# Altium PCB adau1979-fpga.PcbDoc (part 5 of 10)
Units mil, origin at the board's own origin, x right, y up, seen from the top; angles counter-clockwise.
Board outline 7874.02 x 9055.12 mil, 4 copper layers (Top Layer, GND, POWER, Bottom Layer), stack 23.756 mil thick; 636 components, 457 nets, 2015 pads, 4184 vias.
Unrouted connection lines stored in the file: 10.
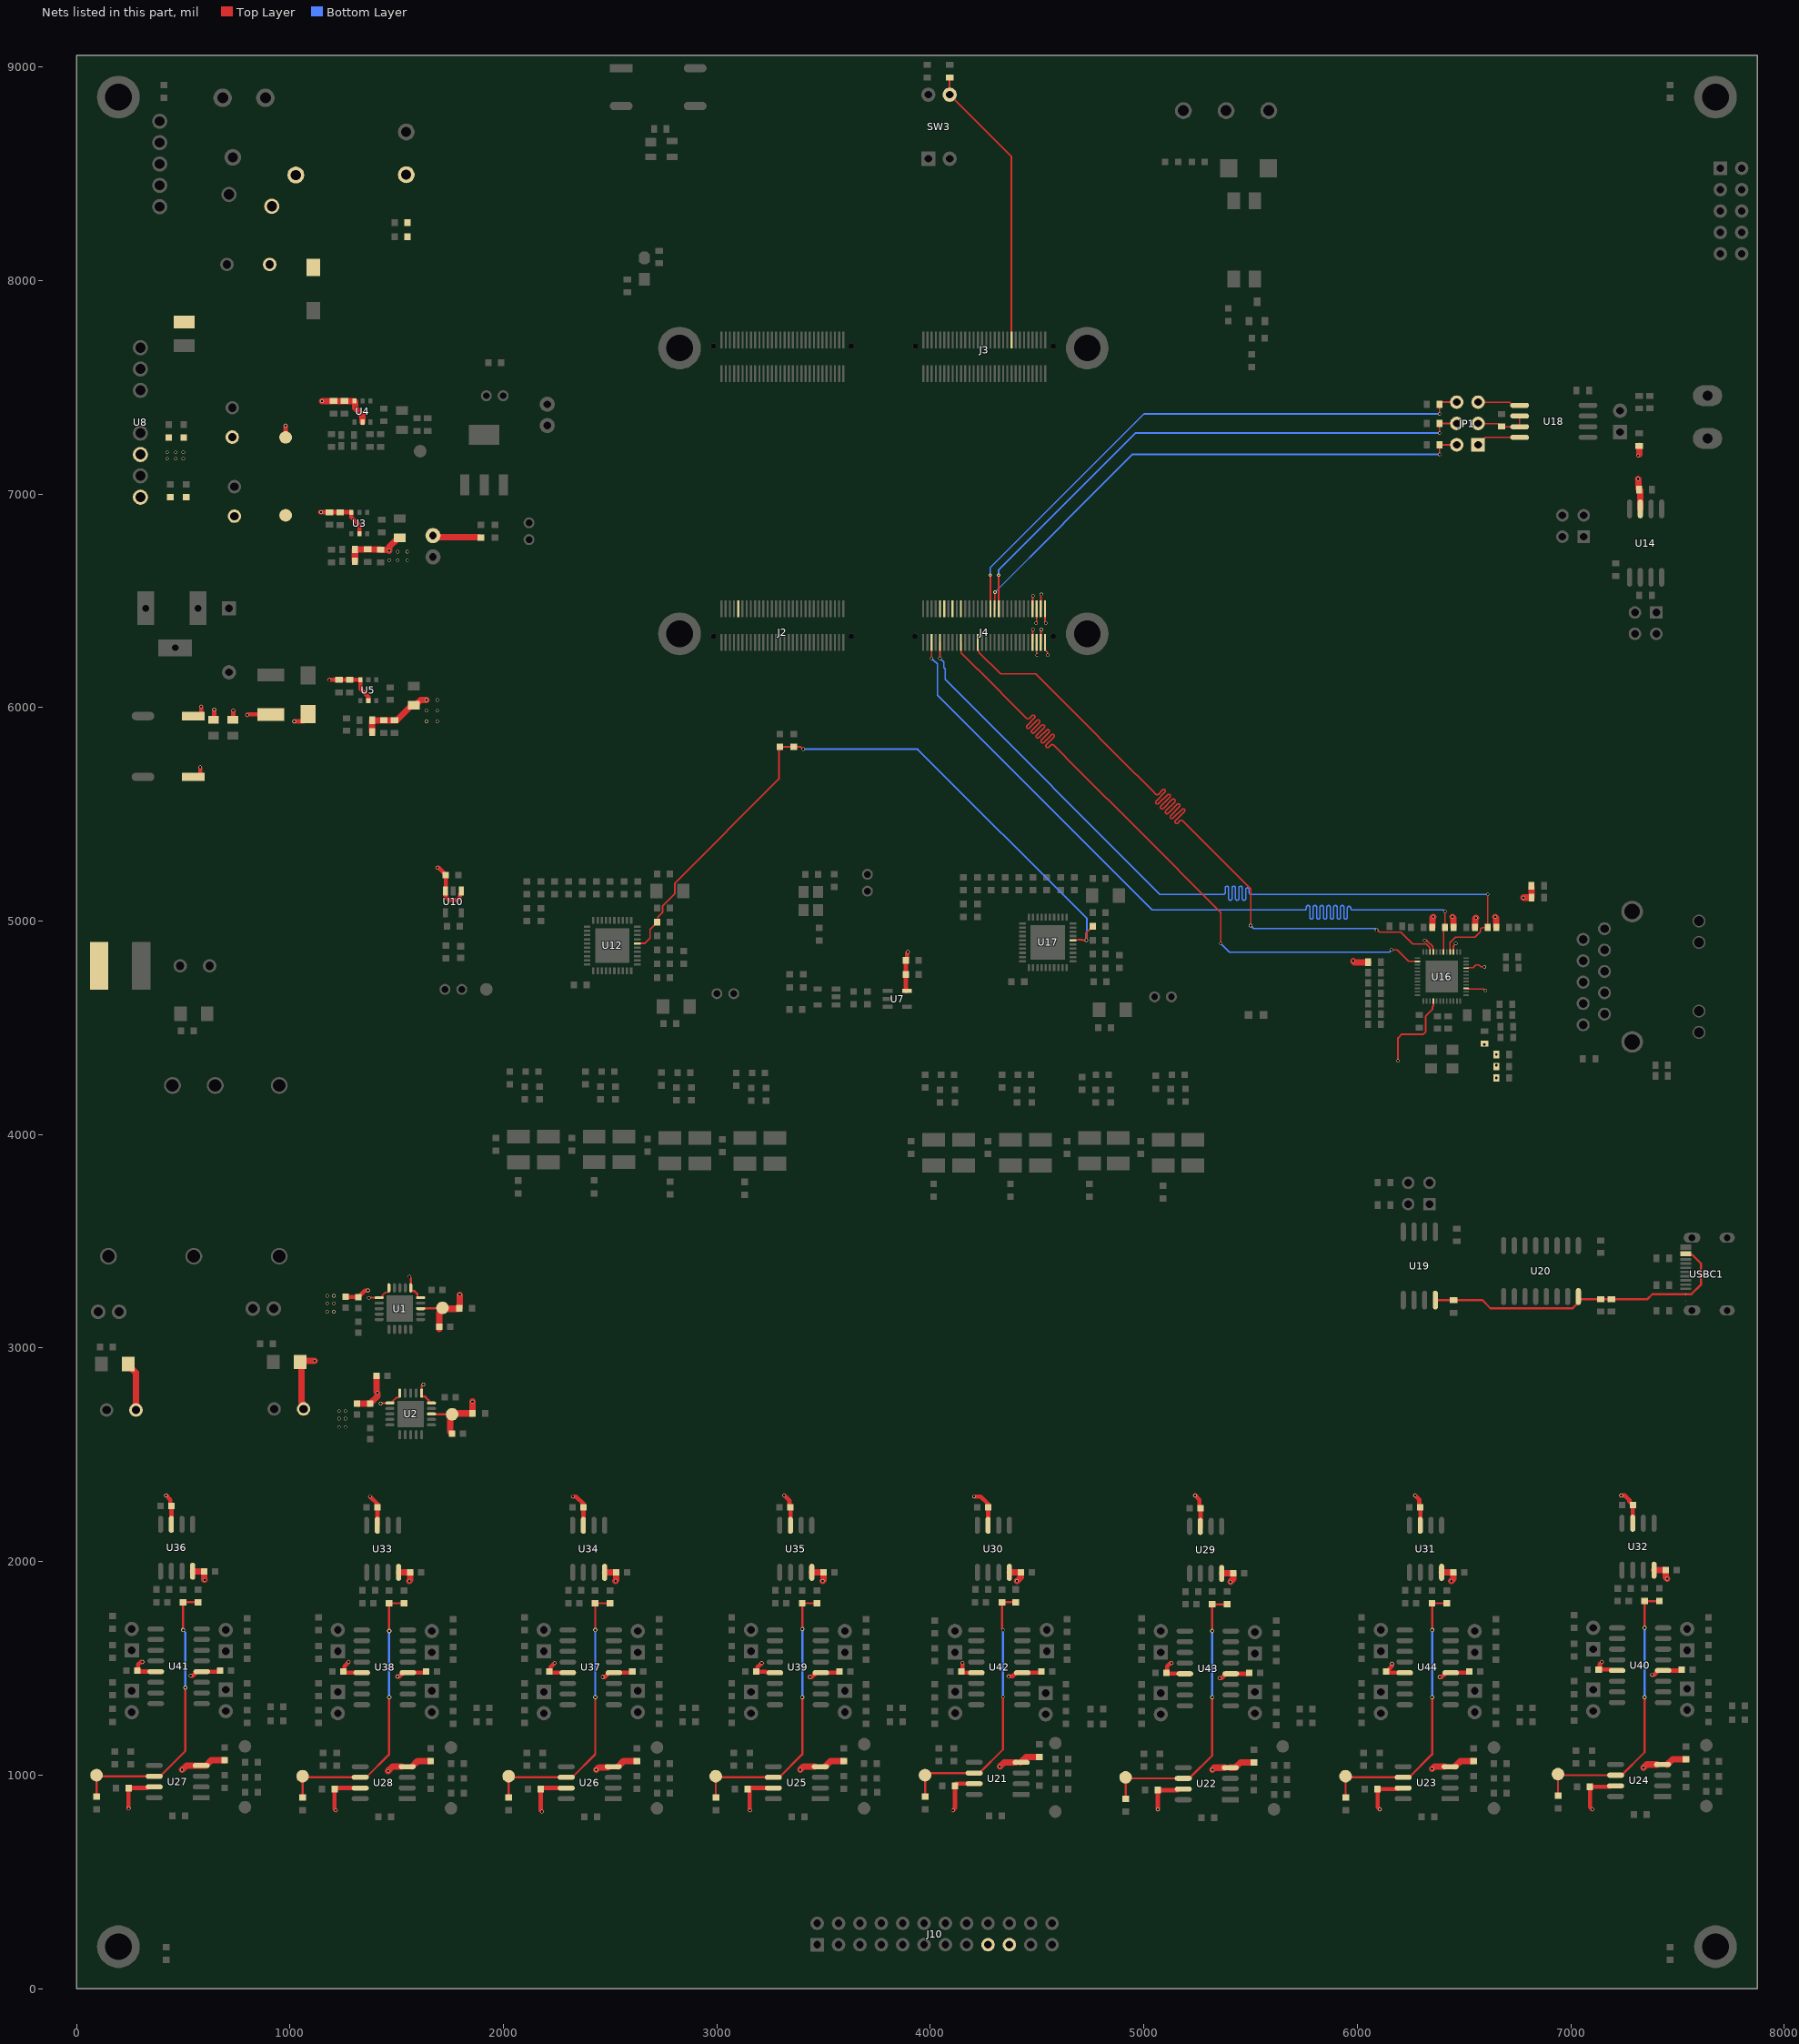
[diagram p4: the nets of this part, all layers, seen from the top]

## Part data (continued)
U9: "输入类型:DC;正向压降(Vf):1.2V;输出电流:50mA;隔离电压(Vrms):5kV;直流反向耐压(Vr):6V;负载电压:80V;输出通道数:-;集射极饱和电压(VCE(sat)):200mV@20mA,1mA;", Current Transfer Ratio (CTR) Maximum/Saturation Value=600%, Current Transfer Ratio (CTR) Minimum=50%, Forward Current(If)=50mA, Isolation Voltage(Vrms)=5kV, JLCPCB Part Class="Extended Part", LCSC Part Name="DC输入 隔离电压(rms):5000V", Load Voltage=80V, Manufacturer=SHARP(夏普), ManufacturerPart=PC817X2CSP9F, Operating Temperature=-30℃~+100℃, Reverse Voltage=6V, Total Power Dissipation(Pd)=200mW, Voltage - Forward(Vf)=1.2V, AddInBom=yes, ConvertToPcb=yes, Datasheet=https://item.szlcsc.com/datasheet/PC817X2CSP9F/67489.html, Fall time=3us, FootprintName=SMD-4_L4.6-W6.5-P2.54-LS10.2-TL, Input type=DC, ModelId=991879f0d3e24dbd9895164815fb95aa, ModelName=SMD-4_L4.6-W6.5-H3.7-LS10.2-P2.54, ModelTransform=401.94494,181.102,0,0,0,0,0,0.003,0, Number of Outputs=-, Output Current=50mA, Output Type=光电三极管, Rise time=4us, Supplier=LCSC, Supplier Footprint=SMD-4P, SupplierPart=C66405, Symbol=PC817X2CSP9F, Vce Saturation(VCE(sat))=200mV@20mA,1mA
U10: "输出极性:正极;工作电压:5.5V;输出电压:3.3V;输出电流:250mA;电源纹波抑制比(PSRR):82dB@(1kHz);输出类型:固定;", JLCPCB Part Class="Extended Part", LCSC Part Name="3.3V 250mA 5.5V", Manufacturer=TI(德州仪器), ManufacturerPart=LP5907MFX-3.3/NOPB, Operating Temperature=-40℃~+125℃@(Tj), Output Current=250mA, Output Voltage=3.3V, Power Supply Rejection Ratio (PSRR)=82dB@(1kHz), standby current=12uA, Voltage - Supply=5.5V, Voltage Dropout=250mV@(250mA), AddInBom=yes, ConvertToPcb=yes, Datasheet=https://www.ti.com/cn/lit/ds/symlink/lp5907.pdf, Features=热关断；使能控制；输出放电；短路保护；输入欠压保护, FootprintName=SOT-23-5_L3.0-W1.7-P0.95-LS2.8-BR, ModelId=0a2a1b8f50944f73965918ad6e5fe167, ModelName=SOT-23-5_L2.9-W1.6-H1.1-LS2.8-P0.95, ModelTransform=114.173,109.636,0,180,0,0,0,0,0, Noise=10uVrms, Number of Outputs=1, Output Configuration=正极, Output Type=固定, Supplier=LCSC, Supplier Footprint=SOT-23-5, SupplierPart=C80670, Symbol=LP5907MFX-3.3/NOPB
U11: Dropout Voltage=1.3V@(800mA), JLCPCB Part Class="Basic Part", LCSC Part Name="输出3.3V 1A", Manufacturer=AMS, Manufacturer Part=AMS1117-3.3, MAX Output Current=1A, Maximum Input Voltage=-, Output Voltage=3.3V, Power Supply Rejection Ratio (PSRR)=72dB@(120Hz), Add into BOM=yes, Convert to PCB=yes, Datasheet=https://atta.szlcsc.com/upload/public/pdf/source/20180727/C6186_7A095716F0823C02F1997A905E26C086.pdf, Device=AMS1117-3.3_C6186, Feature=-, Noise=-, Number of Outputs=1, Operating Temperature=-, Output Polarity=正极, Output Type=固定, standby current=-, Supplier=LCSC, Supplier Footprint=SOT-223-3, Supplier Part=C6186, Symbol=AMS1117-3.3
U12 U17: "分辨率:24;工作电压:3.3V~3.6V;接口类型:I2C；SPI;", JLCPCB Part Class="Extended Part", LCSC Part Name=四通道模数转换器(ADC), Manufacturer=ADI(亚德诺), ManufacturerPart=ADAU1979WBCPZ-RL, Operating Temperature=-40℃~+105℃, Voltage - Supply=3.3V~3.6V, AddInBom=yes, ConvertToPcb=yes, Datasheet=https://item.szlcsc.com/datasheet/ADAU1979WBCPZ-RL/209011.html, FootprintName=QFN-40_L6.0-W6.0-P0.50-TL-EP4.1, Interface Type=I2C；SPI, ModelId=7c9bc19ca4c64354924a13059f0c15c7, ModelName=QFN-40_L6.0-W6.0-P0.50-TL-EP4.1, ModelTransform=237.007,237.007,0,0,0,0,0,0,0, Number of Channels=4, Resolution=24, Supplier=LCSC, Supplier Footprint=LFCSP-40(6x6), SupplierPart=C207957, Symbol=ADAU1979WBCPZ-RL
U13: "特性：超宽4:1输入电压范围。高效率达90%。空载功耗低至0.24W。I/O隔离测试电压1.5kV DC。输入欠压保护、输出短路、过流、过压保护。工作环境温度范围：-40℃至+105℃。应用：工业控制。电力", JLCPCB Part Class="Extended Part", LCSC Part Name="15W 隔离式 DC-DC 转换器", Manufacturer=MORNSUN(金升阳), ManufacturerPart=URA2415YMD-15WR3, AddInBom=yes, ConvertToPcb=yes, Datasheet=https://item.szlcsc.com/datasheet/URA2415YMD-15WR3/5842586.html, FootprintName=PWRM-TH_URA2415YMD-15WR3, Supplier=LCSC, Supplier Footprint=DIP,25.4x25.4mm, SupplierPart=C5182197, Symbol=URA2415YMD-15WR3_C5182197
U18: library part TJA1057GT3, CLASS=IC
U21 U22 U23 U24 U25 U26 U27 U28: library part AD620BR, "CI-AD620BR"
U29 U30 U31 U32 U33 U34 U35 U36: "LT1793CS8#PBF", AddInBom=yes, DesignItemID=LT1793, Device=LT1793, FootprintName=SOP-8, LibraryName="1.6 - ADI系列精密运放", OriginModelName="User Library-so-8", SymbolName=LT1793
  U29: UniqueId=b94fd32bcc95872d
  U30: UniqueId=2c27b242a2875aaf
  U31: UniqueId=be87043ebfc5f98d
  U32: UniqueId=03a1f9b1f2129ca8
  U33: UniqueId=4ec783ed4741de1f
  U34: UniqueId=484e3008dca2bfa8
  U35: UniqueId=2dbbb3175ebf36d7
  U36: UniqueId=124c013cfc851acc
U37 U38 U39 U40 U41 U42 U43 U44: library part DG201BDY-T1E3, AddInBom=yes, DesignItemID=DG201BDY-T1E3, Device=DG201BDY-T1E3, FootprintName=dg201BDY, LibraryName="4.1 - 未分类器件", SymbolName=DG201BDY-T1E3
  U37: UniqueId=6151f2f354ad58a1
  U38: UniqueId=ea6c5e45b64ed132
  U39: UniqueId=6e245fde712204fc
  U40: UniqueId=ca4d2b64b6ec8380
  U41: UniqueId=4bb3335060f18692
  U42: UniqueId=1bdc0ab44f99f92d
  U43: UniqueId=c69de7c088414df5
  U44: UniqueId=28995c53ef78d865
USBC1: Current Rating-Power=5A, JLCPCB Part Class="Extended Part", LCSC Part Name="Type-C 母", Manufacturer=韩国韩荣, Operating Temperature=-, Add into BOM=yes, Connector Type=Type-C, Convert to PCB=yes, Datasheet=https://item.szlcsc.com/datasheet/TYPE-C-31-M-12/177331.html, Device=TYPE-C-31-M-12, Gender=母, Manufacturer Part=TYPE-C-31-M-12, Mounting Type=-, Number of Contacts=16P, Number of Ports=1, Protocol Standard=-, Supplier=LCSC, Supplier Footprint=SMD, Supplier Part=C165948, Symbol=TYPE-C-31-M-12
Y1: library part CRYSTAL_4P, CLASS=IC
U1: AddInBom=yes, DesignItemID=TPS7A4701, Device=TPS7A4701, FootprintName=PCBComponent_1, LibraryName="1.1 - 电源类芯片", Origin Footprint=VQFN-20_L5.0-W5.0-P0.65-TL-EP, OriginFootprint 2=VQFN, Symbol=TPS7A4701
U14: CLASS=IC

## Free pads (board coordinates)
  round 200 hole 125: 1(196.85,196.85) 2(7677.17,196.85) 3(2825,6345) 3(2825,7683.58) 3(4734.76,6345) 3(4734.76,7683.58) 3(7677.17,8858.27) 4(196.85,8858.27)

## Via types
v1: diameter 50, hole 28, Top Layer to Bottom Layer, 3377 vias
v2: diameter 16, hole 12, Top Layer to Bottom Layer, 784 vias
v3: diameter 20, hole 12, Top Layer to Bottom Layer, 14 vias
v4: diameter 16, hole 8, Top Layer to Bottom Layer, 9 vias

## Nets (pads, with @x,y where several pads share a name; then routed paths per layer and width w, separated by ;. In a path a pad name is that pad's centre, name@x,y a point inside that pad or via, vN(x,y) a via of type N, cw(c..) or ccw(c..) an arc to the next point about the centre after c; other vN are vias at no path point)
1V8: C26.2 C27.2 C29.1 C105.2 C106.2 L3.2 R15.1 R60.2 R61.2 R62.2 R63.2 R86.2 U16.15 U16.21 | length 851.8
  Top Layer w8: v2(6315,4909.56) 6316.53,4908.03 6325.6,4908.03 6352.53,4881.09 6352.53,4872.99 6353.82,4871.7 6353.82,4865.31 U16.21@6355.57,4863.56 ; U16.15@6450.12,4854.47 6450.12,4882.96 6460,4892.84 v2(6460,4895)
  Top Layer w30: C29.1@1384.53,5885 R15.1@1384.53,5940 1384.76,5939.76 1484.76,5939.76 1485,5939.53 C27.2@1486.5,5939.53 ; C27.2@1490,5939.53 1499.53,5939.53 1565,6005 1575,6005 L3.2@1580,6010 1587.5,6010 1612.5,6035 v2(1640,6035) ; v2(5980,4812) 5985.33,4806.67 R86.2@6050.47,4806.67 ; R63.2@6350.47,4970 6351.69,4971.22 6351.69,5016.69 v2(6355,5020) ; v2(6445,5020) 6449.25,5015.75 6449.25,4971.22 6450.24,4970.24 R62.2@6450.24,4982 ; R61.2@6550.71,4982 6550.71,4970.24 6552.17,4971.69 6552.17,5012.17 v2(6555,5015) ; v2(6645,5020) 6649.25,5015.75 6649.25,4971.22 6650.24,4970.24 R60.2@6650.24,4982 ; v2(6777.24,5109.76) C105.2@6811.77,5109.76 ; C105.2@6815.94,5110 6816.3,5110.35 6816.3,5156.91 C106.2@6816.65,5157.26
  other v2: 1640,5935 1690,5935 1640,5985 1690,5985 1690,6035
5V_USB: C113.2 C129.1 C130.1 U19.8 U20.16 USBC1.A4B9 USBC1.B4A9 | length 1526
  Top Layer w10: U19.8@6365,3225 6365.47,3224.53 C113.2@6450,3224.53 6585.43,3224.53 6623.47,3186.5 7008,3186.5 7035,3213.5 U20.16@7035,3235.99 ; USBC1.B4A9@7537.04,3441.27 7541.73,3436.58 7568.84,3436.58 7610,3395.42 7610,3298.12 7564.16,3252.28 USBC1.A4B9@7537.04,3252.28 7381.25,3252.28 7358.5,3229.53 C130.1@7190,3229.53 C129.1@7140,3229.53 7041.47,3229.53 U20.16@7035,3235.99 ; U20.16@7035,3235.99 U20.16@7035,3241.5 U20.16@7035,3235.99
24V: C43.1 C44.1 C45.1 C46.1 D3.1 F2.2 L4.1 L8.1 R25.1
485_DE: J4.24 JP1.4 R118.1 | length 2639
  Top Layer w8: v4(4320,6620) 4320.15,6619.85 4320.15,6462.01 J4.24@4320.31,6461.85 ; v2(6385,7285) 6384.76,7285.24 6384.76,7329.76 R118.1@6384.53,7330 JP1.4@6465,7330
  Bottom Layer w8: v4(4320,6620) 4320,6645 4960,7285 v2(6385,7285)
485_RXD: J4.28 JP1.6 R124.1 | length 2726.1
  Top Layer w8: v4(4280,6620) 4280.47,6619.53 4280.47,6462.32 J4.28@4280.94,6461.85 ; R124.1@6384.53,7420 6384.76,7419.76 6384.76,7375.24 v2(6385,7375) ; R124.1@6384.53,7421.22 6393.31,7430 JP1.6@6465,7430
  Bottom Layer w8: v4(4280,6620) 4280,6655 5000,7375 v2(6385,7375)
485_TXD: J4.26 JP1.2 R111.1 | length 2555.9
  Top Layer w8: J4.26@4300.63,6461.85 4301.39,6462.61 4301.39,6539.23 v4(4302.15,6540) ; v2(6385,7185) 6384.76,7185.24 6384.76,7229.76 R111.1@6384.53,7230 JP1.2@6465,7230
  Bottom Layer w8: v4(4302.15,6540) 4302.47,6540 4624.5,6862.03 4624.5,6864.5 4945,7185 v2(6385,7185)
485DE: JP1.3 R99.2 U18.2 U18.3 | length 251.2
  Top Layer w6: JP1.3@6565,7330 6656.54,7330 6671.06,7315.47 R99.2@6675,7315.47 6675.47,7315 U18.3@6760,7315 U18.2@6760,7365
485RXD: JP1.5 U18.1 | length 201.2
  Top Layer w6: JP1.5@6565,7430 6713,7430 6728,7415 U18.1@6760,7415
485TXD: JP1.1 U18.4 | length 209.5
  Top Layer w6: JP1.1@6565,7230 6600,7265 U18.4@6760,7265
+5: C11.2 C12.2 C13.1 C35.2 C36.2 C38.2 C75.2 J6.1 L1.2 R9.1 R27.1 R77.2 U7.5 U10.1 U10.3 U14.3 | length 1162.4
  Top Layer w20: v2(1690,5250) 1695.87,5250 1730.08,5215.79 C38.2@1730.08,5215 1730.08,5153.53 U10.3@1727.6,5151.05 ; U10.3@1727.6,5141.2 1729.4,5139.4 1729.4,5115.07 1744.92,5099.55 1785.08,5099.55 1796.8,5111.27 1796.8,5125.75 1802.4,5131.35 U10.1@1802.4,5141.2 ; U7.5@3890.42,4672.4 3885.35,4672.4 3885,4672.75 3885,4750 3885,4815 3890.04,4820.04 3890.04,4850.04 v2(3895,4855) ; v2(7315,7180) v2@7320,7185
  Top Layer w30: C13.1@1304.53,6685 R9.1@1304.53,6740 1425,6740 1426.69,6738.31 1461.69,6738.31 v2(1465,6735) 1465,6752.5 1502.5,6790 1510,6790 L1.2@1515,6795 ; J6.1@1670,6805 1677.82,6797.18 R27.1@1885,6797.18 ; v2(7315,7070) 7317.28,7067.72 7317.28,7023.19 C75.2@7320.47,7020 7324.25,7016.22 7324.25,7004.72 7325,7003.98 U14.3@7325,6930 ; v2@7320,7185 R77.2@7320,7225.47
  other v2: 1465,6690 1505,6690 1550,6690 1505,6730 1550,6730
+12V: C2.1 C180.2 C182.2 C184.2 C186.2 C188.2 C190.2 C192.2 C194.2 C196.2 C198.2 C200.2 C202.2 C204.2 C206.2 C208.2 C210.2 R2.2 U1.1 U1.20 U29.7 U30.7 U31.7 U32.7 U33.7 U34.7 U35.7 U36.7 U37.13 U38.13 U39.13 U40.13 U41.13 U42.13 U43.13 U44.13 | length 2591.1
  Top Layer w8: v2@1376.65,3236.18 1430.34,3236.18 1433.26,3239.1 1433.26,3247.08 1447.19,3261.01 1455.17,3261.01 1463.82,3269.66 U1.20@1463.82,3282.18
  Top Layer w20: v2(309.41,1530) 300.85,1530 289.13,1518.28 289.13,1494.13 C202.2@284.99,1489.99 289.28,1485.7 371,1485.7 U41.13@371.71,1485 ; v2(420,2310) 439.99,2290.01 439.99,2264.99 C194.2@444.99,2259.99 U36.7@445,2175 ; C2.1@1260.58,3239.98 1321.53,3239.98 1351.54,3270 v2(1365,3270) ; v2(1275,1530) 1254.99,1509.99 1254.99,1489.99 C198.2@1249.99,1484.99 1254.28,1480.7 1336,1480.7 U38.13@1336.71,1480 ; v2(1375,2305) 1410,2270 U33.7@1410,2170 ; v2(2240,1525) 2219.99,1504.99 2219.99,1489.99 C196.2@2214.99,1484.99 2219.28,1480.7 2301,1480.7 U37.13@2301.71,1480 ; v2(2325,2305) 2340,2305 2375,2270 U34.7@2375,2170 ; v2(3210,1525) 3189.99,1504.99 3189.99,1489.99 C200.2@3184.99,1484.99 3229.99,1484.99 3234.28,1480.7 3271,1480.7 U39.13@3271.71,1480 ; v2(3315,2310) 3339.99,2285.01 3339.99,2259.99 C192.2@3344.99,2254.99 U35.7@3345,2170 ; v2(4150,1525.61) 4150,1490 C204.2@4145,1485 4149.29,1480.71 4214.29,1480.71 U42.13@4215,1480 ; v2(4205,2305) 4235.59,2305 4270.59,2270 U30.7@4270.59,2170 ; v2(5130,1525) 5124.62,1525 5121.15,1521.53 5119.91,1521.53 5108.19,1509.82 5108.19,1482.6 C206.2@5105.59,1480 5109.88,1475.7 5191,1475.7 U43.13@5191.71,1475 ; v2(5240,2310) 5259.99,2290.01 5259.99,2254.99 C180.2@5264.99,2249.99 U29.7@5265,2165 ; v2(6162.07,1521.87) 6162.07,1512.07 C210.2@6134.99,1484.99 6139.99,1480 U44.13@6221.71,1480 ; v2(6270,2310) 6289.99,2290.01 6289.99,2259.99 C184.2@6294.99,2254.99 U31.7@6295,2170 ; v2(7145,1530) 7134.99,1519.99 7134.99,1499.99 C208.2@7129.99,1494.99 7183.76,1494.99 7188.76,1490 U40.13@7216.71,1490 ; v2(7235,2310) 7252.09,2310 7273.81,2288.28 7273.81,2281.17 C186.2@7289.99,2264.99 U32.7@7290,2180 ; U32.7@7289.41,2180 U32.7@7289.7,2180.29
  other v2: 1175,3170 1205,3170 1175,3210 1205,3210 1370,3235 1175,3245 1205,3245
+12V_d: +1.1 C9.2 C10.2 C14.1 C15.1 C16.2 C17.2 C20.2 C21.2 C22.2 C23.2 C37.2 C47.1 C48.1 D1.2 F1.2 J4.1@4536.85,6304.37 J4.2 J4.3 J4.4 J4.5 J4.6 J4.7 J4.8 U3.3 U3.5 U4.3 U4.5 U5.3 U5.5 U8.6 | length 1691.4
  Top Layer w8: J4.7@4477.79,6304.37 4478.71,6305.29 4478.71,6343.71 4480,6345 v2(4480,6365) ; J4.8@4477.79,6461.85 4478.71,6462.77 4478.71,6521.19 v2(4480,6522.48) ; v2(4495,6395) 4495,6397.16 4497.48,6399.64 J4.6@4497.48,6461.85 ; J4.5@4497.48,6304.37 4497.48,6249.68 4500,6247.16 v2(4500,6245) ; J4.3@4517.16,6304.37 4517.16,6360 4520,6362.84 v2(4520,6365) ; J4.4@4517.16,6461.85 4517.16,6525 4520,6527.84 v2(4520,6530) ; J4.1@4536.85,6304.37 4536.85,6269.92 4548.47,6258.3 4548.47,6246.53 v2(4550,6245) ; J4.2@4536.85,6461.85 4536.85,6400.31 4540,6397.16 v2(4540,6395)
  Top Layer w20: C14.1@580,5675 v2(580,5719.53) ; C15.1@585,5960 v2(585,6004.53) ; C16.2@645,5935.67 v2(645,5990) ; C17.2@734.99,5940.56 v2(734.99,5985.09) ; v2(800,5965) 802.5,5967.5 F1.2@910,5967.5 ; +1.1@980,7275 v2(980,7319.53) ; v2(1020.47,5935) D1.2@1065,5935 ; v2@1140,6915 1184.53,6915 C10.2@1185,6914.53 1286.5,6914.53 U3.3@1288.07,6912.95 1288.07,6891.4 1325.47,6854 U3.5@1325.47,6814.53 ; v2(1185.47,6129.53) C22.2@1230,6129.53 1329.84,6129.53 U5.3@1330,6129.69 ; U5.3@1330,6130 U5.3@1330,6129.69 ; U5.5@1367.4,6031.57 1367.24,6031.73 1367.24,6050.95 1330,6088.19 U5.3@1330,6129.69
  Top Layer w30: v2(1150,7435) C20.2@1205,7435 C21.2@1255,7435 U4.3@1302.6,7435 1305.16,7432.44 1305.16,7401.93 1340,7367.09 U4.5@1340,7336.57
  other v2: 1145.47,6914.53 425,7165 465,7165 500,7165 425,7195 465,7195 500,7195
+15V: +2.1 C1.1 C67.2 C70.1 C146.1 C149.1 C150.1 C151.1 C152.1 C153.1 C154.1 C155.1 J10.17 L9.2 U1.13 U1.15 U1.16 U21.7 U22.7 U23.7 U24.7 U25.7 U26.7 U27.7 U28.7 | length 2308.8
  Top Layer w10: v2(1560,3335) 1560,3333.38 1566.18,3327.2 U1.16@1566.18,3282.18 1566.18,3269.12 1568.18,3267.12 1582.88,3267.12 1597.13,3252.87 1597.13,3238.18 U1.15@1599.13,3236.18 ; U1.13@1612.19,3185 U1.13@1626.52,3185 ; U1.15@1612.19,3236.18 U1.15@1626.52,3236.18 ; U1.13@1629.41,3185.83 1711.76,3185.83 +2.1@1714.41,3188.48
  Top Layer w20: v2(245,845) 244.33,845.67 C154.1@244.33,940 330.32,940 335.32,945 U27.7@364.41,945 ; v2(1215,835) 1209.33,840.67 1209.33,929.25 1214.29,934.21 1214.29,940 U28.7@1305,940 ; v2(2180,830) 2174.33,835.67 C152.1@2174.33,935 2174.33,935.32 2179,940 U26.7@2265,940 ; v2(3155,835) 3154,836 3154,940 U25.7@3240,940 ; v2(4105,835) 4114.92,844.92 C146.1@4114.92,950 4114.92,951.67 C146.1@4119,955.75 ; C146.1@4119,960 U21.7@4205,960 ; v2(5065,840) 5065,925.71 5069.29,930 U22.7@5160,930 ; C150.1@6099.29,935 6094.33,930.04 6094.33,850.67 v2(6105,840) ; C150.1@6104,935 U23.7@6190,935 ; C151.1@7094.29,945 7089.33,940.04 7089.33,850.67 v2(7100,840) ; C151.1@7099,945 U24.7@7185,945
  Top Layer w30: L9.2@242.7,2925 242.7,2920.22 278.9,2884.02 C70.1@278.9,2710 ; C1.1@1699.41,3088.88 C1.1@1699.41,3100 1699.41,3165.61 1714.41,3180.62 +2.1@1714.41,3188.48 1718.67,3184.23 1790.24,3184.23 1795,3188.99 v2(1795,3250)
-12V: C4.1 C5.1 C181.2 C183.2 C185.2 C187.2 C189.2 C191.2 C193.2 C195.2 C197.2 C199.2 C201.2 C203.2 C205.2 C207.2 C209.2 C211.2 R5.2 U2.1 U2.20 U29.4 U30.4 U31.4 U32.4 U33.4 U34.4 U35.4 U36.4 U37.4 U38.4 U39.4 U40.4 U41.4 U42.4 U43.4 U44.4 | length 2304.2
  Top Layer w8: v2(1425,2740) 1427.16,2740 1429.86,2742.7 U2.1@1468.41,2742.7 1480.92,2742.7 1483.85,2745.62 1483.85,2753.59 1497.78,2767.52 1505.75,2767.52 1514.41,2776.18 U2.20@1514.41,2788.7
  Top Layer w20: v2(535,1465) 545.12,1465 559.45,1479.33 559.45,1483.29 561.16,1485 U41.4@587.11,1485 668.82,1485 C203.2@673.82,1490 ; v2(1503.68,1462.5) 1513.8,1462.5 1528.13,1476.83 U38.4@1528.13,1480.79 ; U38.4@1552.11,1480 1633.82,1480 C199.2@1638.82,1485 ; v2(2465,1460) 2475.12,1460 2489.45,1474.33 2489.45,1478.29 2491.16,1480 U37.4@2517.11,1480 2598.82,1480 C197.2@2603.82,1485 ; v2(3435,1460) 3445.12,1460 3459.45,1474.33 3459.45,1478.29 3461.16,1480 U39.4@3487.11,1480 3568.82,1480 C201.2@3573.82,1485 ; v2(4366.59,1462.79) 4385.24,1462.79 4402.45,1480 4514.41,1480 C205.2@4519.41,1485 ; v2(5355,1455) 5365.12,1455 5379.45,1469.33 5379.45,1473.29 5381.16,1475 U43.4@5407.11,1475 5488.82,1475 C207.2@5493.82,1480 ; v2(6385,1460) 6395.12,1460 6409.45,1474.33 6409.45,1478.29 6411.16,1480 U44.4@6437.11,1480 6518.82,1480 C211.2@6523.82,1485 ; v2(7380,1470) 7390.12,1470 7404.45,1484.33 7404.45,1488.29 7406.16,1490 U40.4@7432.11,1490 7513.82,1490 C209.2@7518.82,1495
  Top Layer w30: U36.4@544.41,1955 C195.2@598.82,1955 598.82,1916.18 v2(600,1915) ; R5.2@1315,2740.59 1374.41,2740.59 C4.1@1375,2740 1410,2775 v2(1410,2790) 1405,2795 C5.1@1405,2870 ; U33.4@1509.41,1950 C189.2@1563.82,1950 1563.82,1913.82 v2(1560,1910) ; U34.4@2474.41,1950 C191.2@2528.82,1950 2528.82,1913.82 v2(2525,1910) ; U35.4@3444.41,1950 C193.2@3498.82,1950 3498.82,1913.82 v2(3495,1910) ; U30.4@4370,1950 C183.2@4424.41,1950 4424.41,1927.41 4407,1910 v2(4405,1910) ; U29.4@5364.41,1945 C181.2@5418.82,1945 5418.82,1918.82 v2(5405,1905) ; U31.4@6394.41,1950 C185.2@6448.82,1950 6448.82,1918.82 v2(6440,1910) ; U32.4@7389.41,1960 C187.2@7443.82,1960 7443.82,1926.18 v2(7450,1920)
  other v2: 1230,2630 1260,2630 1230,2670 1260,2670 1230,2705 1260,2705
-12V_d: -1.1 C42.2 C49.2 C50.1 U8.8
-15V: -3.1 C6.1 C62.1 C63.2 C156.2 C158.SS C161.2 C163.2 C165.2 C167.2 C169.2 C171.2 J10.19 L7.2 U2.13 U2.15 U2.16 U21.4 U22.4 U23.4 U24.4 U25.4 U26.4 U27.4 U28.4 | length 2185.9
  Top Layer w10: v2(1625,2830) 1625,2829.61 1616.77,2821.37 U2.16@1616.77,2788.7 1616.77,2775.64 1618.77,2773.64 1631.84,2773.64 1649.99,2755.49 1649.99,2744.7 1651.99,2742.7 U2.15@1662.78,2742.7 ; U2.13@1662.78,2691.52 1663.53,2690.76 1759.24,2690.76 -3.1@1760,2690
  Top Layer w30: v2(495,1025) 515,1045 U27.4@584.41,1045 606.41,1045 631.48,1070.08 C169.2@694.41,1070.08 ; L7.2@1047.7,2935 1052.7,2940 v2(1115,2940) ; L7.2@1053.71,2937.5 1053.71,2748.51 1057.59,2744.64 1057.59,2721.31 C63.2@1063.9,2715 ; v2(1460,1020) 1480,1040 U28.4@1524.41,1040 ; U28.4@1571.41,1040 1596.48,1065.08 C171.2@1659.41,1065.08 ; C6.1@1758.82,2600 1750.25,2608.56 1750.25,2672.39 1760,2682.14 -3.1@1760,2690 1764.25,2694.25 1855.04,2694.25 1855.08,2694.29 C62.1@1855.08,2695 1855.04,2695.04 v2(1855,2750) v2(1855,2750) ; v2(2435,1025) 2447,1037 U26.4@2489.41,1037 ; U26.4@2536.41,1040 2561.48,1065.08 C167.2@2624.41,1065.08 ; v2(3390,1025) 3405,1040 U25.4@3459.41,1040 ; U25.4@3506.41,1040 3531.48,1065.08 C165.2@3594.41,1065.08 ; v2(4325,1040) 4345,1060 U21.4@4400,1060 ; U21.4@4422,1060 4447.08,1085.08 C156.2@4510,1085.08 ; v2(5320,1025) 5330,1035 U22.4@5379.41,1035 ; U22.4@5404.41,1035 5427,1035 5452.08,1060.08 C158.SS@5515,1060.08 ; v2(6350,1030) 6360,1040 U23.4@6409.41,1040 ; U23.4@6456.41,1040 6481.48,1065.08 C161.2@6544.41,1065.08 ; v2(7340,1035) 7355,1050 U24.4@7404.41,1050 ; U24.4@7451.41,1050 7476.48,1075.08 C163.2@7539.41,1075.08
A6: J3.17 R24.2 SW3.3 | length 1348.9
  Top Layer w8: R24.2@4090,8950.47 SW3.3@4090,8870 4379.89,8580.11 J3.17@4379.89,7721.69
A10: J4.52
A11: J4.50
A12: J4.46
A14: J4.42
A15: J4.55 R63.1 U16.18 | length 3955.3
  Top Layer w6: v2(4005.35,6230) J4.55@4005.35,6304.37 ; U16.18@6402.87,4854.47 6402.87,4963.34 6410,4970.47 v2@6410,5045.47
  Bottom Layer w6: v2(4005.35,6230) 4023,6212.35 4023.56,6212.35 4032.03,6203.88 4032.03,6057.97 5037.99,5052.01 5750,5052.01 5753,5052.01 ccw(c5753,5060.01) 5761,5060.01 5761,5065 cw(c5769,5065) 5777,5065 5777,5017 ccw(c5785,5017) 5793,5017 5793,5065 cw(c5801,5065) 5809,5065 5809,5017 ccw(c5817,5017) 5825,5017 5825,5065 cw(c5833,5065) 5841,5065 5841,5017 ccw(c5849,5017) 5857,5017 5857,5065 cw(c5865,5065) 5873,5065 5873,5017 ccw(c5881,5017) 5889,5017 5889,5065 cw(c5897,5065) 5905,5065 5905,5017 ccw(c5913,5017) 5921,5017 5921,5065 cw(c5929,5065) 5937,5065 5937,5017 ccw(c5945,5017) 5953,5017 5953,5061.08 cw(c5961,5061.08) 5969,5061.08 5969,5060.01 ccw(c5977,5060.01) 5977,5052.01 6024.85,5052.01 6401.31,5052.01 6408.32,5045 v2(6410,5045)
A16: J4.51 R61.1 U16.16 | length 3955.3
  Top Layer w6: U16.16@6434.37,4854.47 6434.37,4899.37 6460,4925 6551.58,4925 6576.93,4950.35 6576.93,4961.93 6585,4970 R61.1@6610,4970 v2(6610,5125)
  Top Layer w8: v2(4044.72,6230) J4.51@4044.72,6304.37
  Bottom Layer w6: v2(4044.72,6230) 4062.37,6212.35 4062.37,6187.46 4068.68,6181.14 4068.68,6131.32 5075,5125 5214.58,5125 5370,5125 5373,5125 ccw(c5373,5133) 5381,5133 5381,5155 cw(c5389,5155) 5397,5155 5397,5105 ccw(c5405,5105) 5413,5105 5413,5155 cw(c5421,5155) 5429,5155 5429,5105 ccw(c5437,5105) 5445,5105 5445,5155 cw(c5453,5155) 5461,5155 5461,5105 ccw(c5469,5105) 5477,5105 5477,5147.76 cw(c5485,5147.76) 5493,5147.76 5493,5133 ccw(c5501,5133) 5501,5125 5520,5125 5785,5125 v2(6610,5125)
A17: J4.41 U16.26 | length 3461.2
  Top Layer w6: J4.41@4143.15,6304.37 4143.15,6256.65 4221.3,6178.5 4221.76,6178.5 4440.13,5960.13 4451.43,5948.82 ccw(c4457.09,5954.48) 4462.75,5948.82 4476.42,5962.49 cw(c4482.08,5956.84) 4487.73,5962.49 cw(c4482.08,5956.84) 4487.73,5951.18 4452.42,5915.87 ccw(c4458.08,5910.21) 4452.42,5904.55 ccw(c4458.08,5910.21) 4463.73,5904.55 4499.05,5939.87 cw(c4504.7,5934.21) 4510.36,5939.87 cw(c4504.7,5934.21) 4510.36,5928.55 4475.05,5893.24 ccw(c4480.7,5887.58) 4475.05,5881.92 ccw(c4480.7,5887.58) 4486.36,5881.92 4521.68,5917.24 cw(c4527.33,5911.58) 4532.99,5917.24 cw(c4527.33,5911.58) 4532.99,5905.93 4497.67,5870.61 ccw(c4503.33,5864.95) 4497.67,5859.3 ccw(c4503.33,5864.95) 4508.99,5859.3 4544.3,5894.61 cw(c4549.96,5888.96) 4555.62,5894.61 cw(c4549.96,5888.96) 4555.62,5883.3 4520.3,5847.98 ccw(c4525.96,5842.33) 4520.3,5836.67 ccw(c4525.96,5842.33) 4531.61,5836.67 4566.93,5871.99 cw(c4572.59,5866.33) 4578.24,5871.99 cw(c4572.59,5866.33) 4578.24,5860.67 4542.93,5825.36 ccw(c4548.59,5819.7) 4542.93,5814.04 ccw(c4548.59,5819.7) 4554.24,5814.04 4564.57,5824.37 cw(c4570.23,5818.71) 4575.88,5824.37 4578.01,5822.25 4690.01,5710.25 4965.01,5435.25 5360,5040.25 v2(5360,4895) ; v2(6160,4865) 6186,4865 6240.13,4810.87 U16.26@6280.53,4810.87
  Bottom Layer w6: v2(5360,4895) 5400,4855 6150,4855 v2(6160,4865)
A19: J4.33 U16.22 | length 3519.4
  Top Layer w6: J4.33@4221.89,6304.37 4221.89,6269.92 4226.65,6265.16 4226.65,6264.31 4226.65,6258.75 4328.67,6156.73 4493.27,6156.73 4695,5955 4883.59,5766.41 5045,5605 5055.93,5594.07 ccw(c5061.58,5599.73) 5067.24,5594.07 5087.44,5614.27 cw(c5093.1,5608.62) 5098.76,5614.27 cw(c5093.1,5608.62) 5098.76,5602.96 5057.04,5561.24 ccw(c5062.7,5555.59) 5057.04,5549.93 ccw(c5062.7,5555.59) 5068.35,5549.93 5110.07,5591.65 cw(c5115.73,5585.99) 5121.38,5591.65 cw(c5115.73,5585.99) 5121.38,5580.33 5079.67,5538.62 ccw(c5085.32,5532.96) 5079.67,5527.3 ccw(c5085.32,5532.96) 5090.98,5527.3 5132.7,5569.02 cw(c5138.35,5563.36) 5144.01,5569.02 cw(c5138.35,5563.36) 5144.01,5557.7 5102.3,5515.99 ccw(c5107.95,5510.33) 5102.3,5504.68 ccw(c5107.95,5510.33) 5113.61,5504.68 5155.32,5546.39 cw(c5160.98,5540.73) 5166.64,5546.39 cw(c5160.98,5540.73) 5166.64,5535.08 5124.92,5493.36 ccw(c5130.58,5487.7) 5124.92,5482.05 ccw(c5130.58,5487.7) 5136.24,5482.05 5177.95,5523.76 cw(c5183.61,5518.11) 5189.27,5523.76 cw(c5183.61,5518.11) 5189.27,5512.45 5147.55,5470.73 ccw(c5153.21,5465.08) 5147.55,5459.42 ccw(c5153.21,5465.08) 5158.86,5459.42 5169.06,5469.62 cw(c5174.72,5463.96) 5180.38,5469.62 5182.5,5467.5 5500,5150 v2(5500,4979) ; v2(6090,4958) 6092.16,4958 6102.88,4947.28 6202.52,4947.28 6258.24,4891.56 6322.27,4891.56 6338.95,4874.88 6338.95,4864.43 U16.22@6339.82,4863.56
  Bottom Layer w6: v2(5500,4979) 5500.28,4979 5514.28,4965 6081.31,4965 6088.31,4958 v2(6090,4958)
A20: J2.52
ADC_PD_RST_N: R1.2 R3.2 R66.1 R117.1 U12.6 U17.6 | length 3235.6
  Top Layer w8: U12.6@2628.1,4894.9 2661.01,4894.9 2687,4920.89 2687,4961.13 2720.08,4994.21 R66.1@2720.08,4995.79 ; R66.1@2720.08,4995 2722.99,4997.91 2722.99,5018.06 2745.04,5040.11 2745.04,5070.04 2803.45,5128.45 2803.45,5178.14 3290,5664.69 3290,5815.08 3392.76,5815.08 3402.84,5805 v2(3405,5805) ; U17.6@4668.1,4909.9 4669.6,4911.4 4691.94,4911.4 4692.54,4912 4709.29,4912 4711.12,4910.17 4730.95,4910.17 v2(4731.12,4910) ; v2@4731.12,4910.07 4730.35,4910.83 4730.35,4945.28 4748.33,4963.25 4749.12,4963.25 4760.08,4974.21 R117.1@4760.08,4975
  Bottom Layer w8: v2(3405,5805) 3940,5805 4733,5012 4733,4947.54 4731.12,4945.66 v2(4731.12,4910)
ADIN1: 15.1 R260.1 R267.2 R268.2 U27.6 | length 1338.2
  Top Layer w10: 15.1@94.41,1000 15.1@94.7,999.7 ; R267.2@95,899.84 94.7,900.14 15.1@94.7,999.7 ; v3(500,1680) 500,1809.48 R260.1@499.41,1810.08 R268.2@569.41,1810.08 ; v3(510,1410) 510,1112.59 392.41,995 U27.6@364.41,995 99.41,995 15.1@94.7,999.7
  Bottom Layer w10: v3(500,1680) 500,1677.29 510,1667.29 v3(510,1410)
ADIN2: 16.1 R251.1 R261.2 R262.2 U28.6 | length 1329.9
  Top Layer w10: 16.1@1059.41,995 16.1@1059.7,994.7 ; R261.2@1060,894.84 1059.7,895.14 16.1@1059.7,994.7 ; v3(1465,1365) 1465,1097.59 1357.41,990 U28.6@1329.41,990 1064.41,990 16.1@1059.7,994.7 ; v3(1465,1675) 1465,1804.48 R251.1@1464.41,1805.08 R262.2@1534.41,1805.08
  Bottom Layer w10: v3(1465,1365) v3(1465,1675)
ADIN3: 13.1 R252.1 R263.2 R264.2 U26.6 | length 1329.9
  Top Layer w10: 13.1@2024.41,995 13.1@2024.7,994.7 ; R263.2@2025,894.84 2024.7,895.14 13.1@2024.7,994.7 ; v3(2430,1365) 2430,1097.59 2322.41,990 U26.6@2294.41,990 2029.41,990 13.1@2024.7,994.7 ; v3(2430,1680) 2430,1804.48 R252.1@2429.41,1805.08 R264.2@2499.41,1805.08
  Bottom Layer w10: v3(2430,1365) v3(2430,1680)
ADIN4: 14.1 R253.1 R265.2 R266.2 U25.6 | length 1329.9
  Top Layer w10: 14.1@2994.41,995 14.1@2994.7,994.7 ; R265.2@2995,894.84 2994.7,895.14 14.1@2994.7,994.7 ; v3(3400,1365) 3400,1097.59 3292.41,990 U25.6@3264.41,990 2999.41,990 14.1@2994.7,994.7 ; v3(3400,1685) 3400,1804.48 R253.1@3399.41,1805.08 R266.2@3469.41,1805.08
  Bottom Layer w10: v3(3400,1365) v3(3400,1685)
ADIN5: 9.1 R246.1 R254.2 R255.2 U21.6 | length 1270
  Top Layer w10: R254.2@3975,899.92 9.1@3975,1000 3984.39,1009.39 4004.77,1009.39 4005.39,1010 U21.6@4205,1010 4230,1010 4340,1120 v2@4340,1365 ; R246.1@4335,1810.08 R246.1@4335,1810.08 ; v2(4340,1680) 4340,1681.62 4335,1686.62 4335,1810.04 R246.1@4335,1810.08 ; R255.2@4400,1810.16 4399.96,1810.12 R246.1@4335,1810.08
  Bottom Layer w10: v2(4340,1367) v2(4340,1680)
ADIN6: 10.1 R244.1 R248.2 R249.2 U22.6 | length 1329.9
  Top Layer w10: 10.1@4914.41,990 10.1@4914.7,989.7 ; R248.2@4915,889.84 4914.7,890.14 10.1@4914.7,989.7 ; v3(5320,1365) 5320,1092.59 5212.41,985 U22.6@5184.41,985 4919.41,985 10.1@4914.7,989.7 ; v3(5320,1675) 5320,1799.48 R244.1@5319.41,1800.08 R249.2@5389.41,1800.08
  Bottom Layer w10: v3(5320,1365) v3(5320,1675)
ADIN7: 11.1 R247.1 R256.2 R257.2 U23.6 | length 1329.9
  Top Layer w10: 11.1@5944.41,995 11.1@5944.7,994.7 ; R256.2@5945,894.84 5944.7,895.14 11.1@5944.7,994.7 ; v3(6350,1365) 6350,1097.59 6242.41,990 U23.6@6214.41,990 5949.41,990 11.1@5944.7,994.7 ; v3(6350,1680) 6350,1804.48 R247.1@6349.41,1805.08 R257.2@6419.41,1805.08
  Bottom Layer w10: v3(6350,1365) v3(6350,1680)
ADIN8: 12.1 R250.1 R258.2 R259.2 U24.6 | length 1329.9
  Top Layer w10: 12.1@6939.41,1005 12.1@6939.7,1004.7 ; R258.2@6940,904.84 6939.7,905.14 12.1@6939.7,1004.7 ; v3(7345,1365) 7345,1107.59 7237.41,1000 U24.6@7209.41,1000 6944.41,1000 12.1@6939.7,1004.7 ; v3(7345,1690) 7345,1814.48 R250.1@7344.41,1815.08 R259.2@7414.41,1815.08
  Bottom Layer w10: v3(7345,1365) v3(7345,1690)
ADVDD10_PS: C84.2 C85.2 C86.2 R56.1 U16.3 U16.9 U16.40 | length 599.4
  Top Layer w6: U16.3@6509.47,4684.88 6510.41,4683.94 6523.11,4683.94 6524.61,4682.44 6590.93,4682.44 6598.38,4675 v2(6600,4675) ; U16.9@6509.47,4779.37 6518.62,4779.37 6521.44,4782.18 6542.18,4782.18 6555,4795 6568.65,4795 6578,4785.65 6594.35,4785.65 v2(6595,4785)
  Top Layer w8: v2(6190,4345) 6190,4452.25 6207.75,4470 6309.33,4470 6320,4480.67 6320,4555.58 6352,4587.58 6352,4597.46 6355.63,4601.09 U16.40@6355.63,4625.53
  other v2: 6650.47,4265 6650.47,4325 6650.94,4375 6595,4421.54